# Altium PCB PCB.PcbDoc (part 2 of 5)
Units mm, origin at the board's own origin, x right, y up, seen from the top; angles counter-clockwise.
Board outline 101.6 x 53.34 mm, 6 copper layers (Top Layer, Int1 (GND), Int2, Int3, Int4 (GND), Bottom Layer), stack 1.625 mm thick; 228 components, 228 nets, 1016 pads, 995 vias.
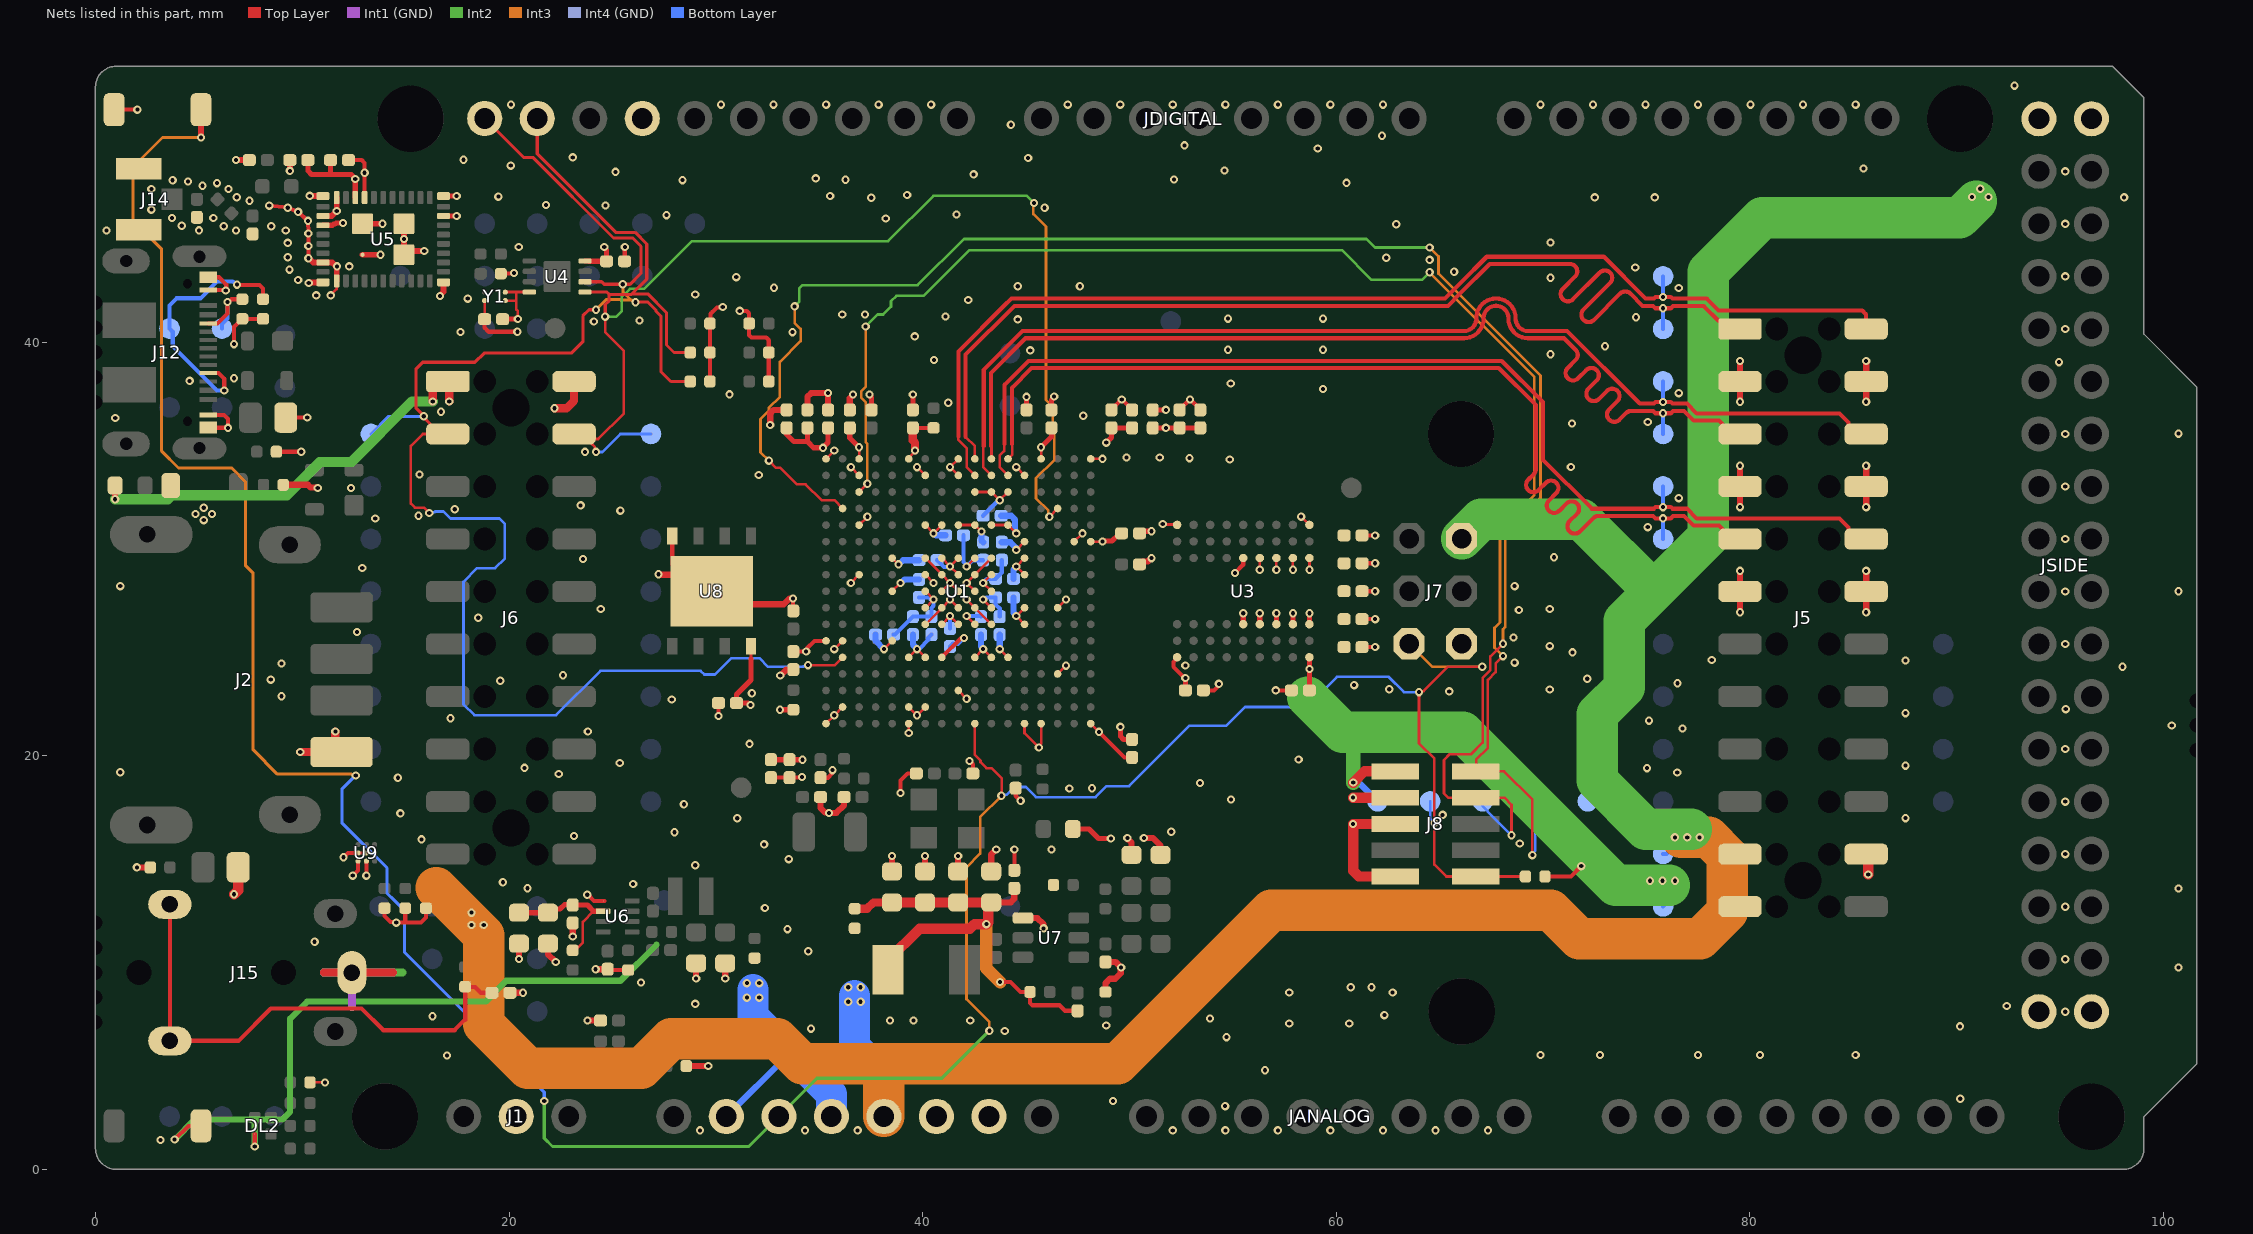
[diagram p6: the nets of this part, all layers, seen from the top]

## Part data
3V3_EN 3V3_J5 5V_EN 5V_J5 BLE_DWAKE BLE_HWAKE BLE_ON BLUE BOOT0/PC13 DFSDM1_CKOUT DFSDM1_DATIN0 DOUT0 DOUT1 DOUT2 DOUT3 DOUT4 DOUT5 DOUT6 DOUT7 DSI_CK_N DSI_CK_P DSI_D0_P DSI_D1_N DSI_D1_P DSID0N GND_J5 GREEN HREF I2S2_CK I2S2_MCK I2S2_SDO I2S2_WS IS2S_SDI JTAG_3V3 JTAG_GND JTAG_NRST JTAG_TCK_SCK JTAG_TMS/SWD LPO_IN PB12 PCLK POWER_EN PWDN PWR_LED RED SCL4 SDATA SDIO_CLK SDIO_CMD SDIO_D0 SDIO_D1 SDIO_D2 SDIO_D3 UART7_CTS UART7_RTS UART7_RX UART7_TX USB0_CC1 USB0_CC2 USB0_DN USB0_DP USB0_VBUS USB1_DN USB1_DP USB1_VBUS VSYNC WIFI_HWAKE WIFI_ON XCLK: library part UT0013-A.4, "Test point 1.00mm", Design Item ID=CMP-018-0005-A.3, Pin Count=1, Source=ut.SchLib
C1 C5 C6 C7 C8 C9 C10 C11 C16 C17 C18 C19 C20 C21 C22 C23 C24 C25 C26 C27 C28 C29 C30 C31 C37 C43 C44 C57 C59 C64 C77 C78 C79 C83: library part C0015-A.14, "CAP CHIP 0402 100nF 10% 50V X5R", Case Code (Imperial)=0402, Dielectric=X5R, Manufacturer=Murata, Tolerance=10%, Voltage=50V, Code Arduino=A5141, Part Number=GRM155R61H104KE19D, Technology=Ceramic
C2 C3: library part C0059-A.14, "CAP CHIP 0805 4.7nF 10% 1000V X7R", Case Code (Imperial)=0805, Dielectric=X7R, Manufacturer="PSA Shenzen", Manufacturer 2=KEMET, Part number 2=C0805V472KDRACTU, Part number 3=C0805C472KDRACTU, Tolerance=10%, Voltage=1kV, Code Arduino=0689, Manufacturer 3=KEMET, Part Number=FV21X472K102ECG, Technology=Ceramic
C4 C55 C56: library part C0095-A.6, Case Code (Imperial)=0402, Part Number=DNP, Code Arduino=C0095, Technology=Ceramic
C12 C36 C73 C74 C75 C76 C80 C81 C82: library part C0091-A.13, "CAP CHIP 0402 10uF 20% X5R 6.3V", Case Code (Imperial)=0402, Dielectric=X5R, Manufacturer=Murata, Tolerance=20%, Voltage=6.3V, Code Arduino=C0091, Part Number=GRM155R60J106ME05D, Technology=Ceramic
C13 C14 C15 C32 C33 C34 C35 C40 C50: library part C0031-A.14, "CAP CHIP 0402 2.2uF 10% 6.3V X5R", Case Code (Imperial)=0402, Dielectric=X5R, Manufacturer=Murata, Tolerance=10%, Voltage=6.3V, Code Arduino=A5529, Part Number=GRM155R60J225KE95D, Technology=Ceramic
C38 C39 C72: library part UT0021-A.3, "DNP CAP 0402", Package=0402, Part Number=DNP
C41 C42: library part C0037-A.14, "CAP CHIP 0402 4.7uF 20% 6V3 X5R", Case Code (Imperial)=0402, Dielectric=X5R, Manufacturer=Hottech, Manufacturer 2="Samsung Electro-Mechanics", Manufacturer 3="Murata Electronics", Part number 2=CL05A475KQ5NRNC, Part number 3=GRM155R60J475ME47D, Tolerance=20%, Voltage=6.3V, Code Arduino=0833, Part Number=C1005A475M6R3NT, Technology=Ceramic
C45 C46 C48 C49 C60 C61 C62 C63 C66 C67 C68 C69: library part C0047-A.18, "CAP CHIP 0603 10uF 20% 25V X5R", Case Code (Imperial)=0603, Dielectric=X5R, Manufacturer=Hottech, Manufacturer 2="Murata Electronics", Part number 2=CL10A106MA8NRNC, Tolerance=20%, Voltage=25V, Code Arduino=2213, Part Number=C1608A106M250NT, Technology=Ceramic
C47: library part C0029-A.14, "CAP CHIP 0402 22pF 5% 50V C0G", Case Code (Imperial)=0402, Dielectric=C0G, Manufacturer=Walsin, Manufacturer 2="Murata Electronics", Manufacturer 3=KEMET, Part number 2=GRM1555C1H220JA01D, Part number 3=C0402C220K5GAC7867, Tolerance=5%, Voltage=50V, Code Arduino=0137, Part Number=0402N220J500CT, Technology=Ceramic
C51 C53: library part C0026-A.14, "CAP CHIP 0402 18pF 5% C0G 50V", Case Code (Imperial)=0402, Dielectric=C0G, Manufacturer=KEMET, Tolerance=5%, Voltage=50V, Code Arduino=2320, Part Number=C0402C180J5GACTU, Technology=Ceramic
C52 C54: library part C0006-A.14, "CAP CHIP 0402 10pF 5% 50V C0G", Case Code (Imperial)=0402, Dielectric=C0G, Manufacturer=KEMET, Tolerance=5%, Voltage=50V, Code Arduino=3382, Part Number=C0402H100J5GACTU, Technology=Ceramic
C65: library part C0013-A.4, "CAP CHIP 0402 100pF 10% 50V C0G", Case Code (Imperial)=0402, Dielectric=C0G, Manufacturer=Yageo, Tolerance=5%, Voltage=50V, Code Arduino=C0013, Part Number=CC0402JRNPO9BN101, Technology=Ceramic
D1: library part D0026-A.6, "DIODE SCHOTTKY SMD 2A 60V SOD123FL", Forward Current=2A, Forward Voltage=0.6V, Manucturer Part Number 2=SS26L, Manufacturer=Nexperia, Code Arduino=2208, Device Type="Diode Schottky", Manucturer 2=Hottech, Part Number=PMEG6020AELRX, RoHS Compliance=RoHS3
D2 D4: library part D0025-A.5, "TVS ARRAY 4LIN.8kV 1pF SOT143B", Manufacturer=Nexperia, Code Arduino=2209, Device Type="ESD protection", Part Number=PRTR5V0U2X,215
DL1: library part L0009-A.5, "LED SMD 0603 GREEN/568 15mcd 120^", Manufacturer=Broadcom, Code Arduino=2204, Part Number=HSMG-C190, Pin Count=2
DL2: library part L0026-A.4, "LED RGB BLACK BODY SMD", Manufacturer="Cree LED", Code Arduino=L0026, Part Number=UHD1110-FKA-CL1A13R3Q1BBQFMF3, Pin Count=4
Fiducial_1 Fiducial_2 Fiducial_3 Fiducial_4 Fiducial_5: library part UT0023-A.6, "Fiducial mark 1mm clearance 2mm"
J1: library part J0237-A.2, "MOUNT A MALE HEADER TH 2.54mm VERT. 1x003POS", Code Arduino=J0237
J2: library part J0329-A.9, "CONN USB A 2.0 FEMALE RIGHT ANGLE SMD + TH TAPE AND REEL", Manufacturer="Adam Tech", Code Arduino=J0329, Part Number=USB-A-S-RA-CS11-SMT-HF-TR
J5: library part J0265-A.9, "CONN SOCKET 2ROW 24POS VERTICAL PASS THROUGH + SMD with fixing + reel + cap for pick and place", Manufacturer=4UCON, Code Arduino=J0265, Connector Type="BOARD CONNECTOR", Contact Material=Copper, Mount=Board, Number of Contacts=24, Part Number=21TW-291, REACH SVHC=Yes, Termination=SMD/SMT
J6: library part J0249-A.9, "CONN SOCKET 2ROW 20POS VERTICAL PASS THROUGH + SMD with fixing + pick and place cap, in reel", Manufacturer=4UCON, Code Arduino=J0249, Connector Type="BOARD CONNECTOR", Contact Material=Copper, Mount=Board, Number of Contacts=20, Part Number=21TW-247, REACH SVHC=Yes, Termination=SMD/SMT
J7: library part J0004-A.5, "CONN Header Through Hole 6 position 0.100\" (2.54mm)", Manufacturer="Adam Tech", Code Arduino=0114, Part Number=PH2-06-UA
J8: library part J0089-A.11, "CONN HEADER SMD 10POS 2x5 1.27MM JTAG reel, capsfor pick and place", Color=Black, Current Rating=1.75A, Manufacturer=4UCON, Package Quantity=1, Code Arduino=J0089, Connector Type="Male Pin", Contact Material=Bronze, Contact Mating Length=0.12inch, Contact Plating=Gold, Depth=3.43mm, Gender=Male, Housing Color=Black, Housing Material=Polymer, Lead Free="Lead Free", Length=6.35mm, Mount="Surface Mount", Packaging=Reel, Part Number=22TW-428, Pitch=1.27mm, Termination=Solder
J12: library part J0272-A.3, "CONN RCPT USB3.1 TYPEC 16POS SMD", Manufacturer=Hirose, Code Arduino=J0272, Part Number=CX90B-16P
J14: library part J0045-A.8, "CONN Micro UFL", Manufacturer=Hirose, Code Arduino=A5364, Part Number=U.FL-R-SMT-1(60), Pin Count=3
J15: library part J0273-A.8, "Conn Jack 4 POLES 3.5mm SMD", Manufacturer=4UCONN, Code Arduino=J0273, Part Number=22TW-258
JANALOG: library part J0313-A.5, "CONN THD 24X1 CUSTOM PITCH DUE JANALOG GREY", Manufacturer=4UCON, Code Arduino=3654, Number of Contacts=24, Number of Positions=24, Number of Rows=1, Part Number=20TW-887, Pin Count=24
JDIGITAL: library part J0262-A.10, "CONN THD 1X26 CUSTOM PITCH DUE JDIGITAL GREY", Manufacturer=4UCON, Code Arduino=3653, Number of Contacts=26, Number of Positions=26, Number of Rows=1, Part Number=20TW-890, Pin Count=26
JSIDE: library part J0315-A.4, "CONN THD 18X2 36V DUE JSIDE CUSTOM GREY", Manufacturer=4UCON, Code Arduino=3656, Number of Contacts=36, Number of Positions=36, Number of Rows=2, Part Number=20TW-891
L1: library part I0065-A.2, "IND FIXED 10UH IRMS 1.8A ISAT 2.3A 243m ohm SMD 4.45x4mm", Current=1.8A, Inductance=10µH, Manufacturer=Bourns, Code Arduino=I0065, Device Type=Inductor, Part Number=SRP4020TA-100M
L2: library part I0051-A.5, "IND FIXED SMD 0603 2.2uH, 20%,", Case Code (Imperial)=0603, DC Resistance (DCR)=250mR, Inductance=2.2µH, Manufacturer=Murata, Max Operating Temperature=85°C, Min Operating Temperature=-40°C, Test Frequency=1MHz, Tolerance=20%, Code Arduino=I0051, Device Type=Inductor, Part Number=LQM18PN2R2MGHD
L3: library part I0045-A.10, "IND CHIP 0806 3.3 uH 20% 1.2A", Case Code (Imperial)=0806, Case Code (Metric)=2016, Current Rating=1.2A, DC Resistance (DCR)=255mR, Inductance=3.3µH, Manufacturer="Taiyo Yuden", Manufacturer 2=Murata, Manufacturer Part Number 2=LQM2MPN3R3NG0L, Max DC Current=1.15A, Max Operating Temperature=105°C, Min Operating Temperature=-40°C, Package Quantity=3000, Resistor Type=Wirewound, Test Frequency=2MHz, Tolerance=20%, Case/Package=0806, Code Arduino=I0045, Core Material=Metal, Device Type=Inductor, Halogen Free="Halogen Free", Height=1mm, Height - Seated (Max)=0.039inch, Length=0.079inch, Mount="Surface Mount", Packaging="Tape and Reel", Part Number=MAKK2016T3R3M, Saturation Current=1.15A, Shielding=Shielded, Termination=SMD/SMT, Width=1.6mm
L4: library part I0063-A.3, "IND 47uH 20% Isat 20mA f 10MHz 0603", Case Code (Imperial)=0603, Current=20mA, DC Resistance (DCR)=2.55, Frequency=10MHz, Inductance=47µH, Manufacturer=Murata, Max DC Current=180mA, Tolerance=20%, Code Arduino=I0063, Part Number=LQM18DH470M70L, Series Resistance=2.55
PB1 PB2: library part B0001-A.7, "PUSHBUTTON WHITE NO ANCHORS", Color=White, Manufacturer=Switronic, Code Arduino=0173, Mount=SMT, Part Number=IT-1185AP1C-160G-GTR
R1 R18: library part R0070-A.24, "RES CHIP 0402 976k 1% 1/16W", Case Code (Imperial)=0402, Manufacturer=Vishay, Power=62.5mW, Temperature Coefficient=100ppm, Tolerance=1%, Code Arduino=R0070, Part Number=CRCW0402976KFKED, Technology="Thick film"
R2 R17 R32 R34 R37: library part R0210-A.18, "RES CHIP 0402 5K1 1% 1/16W", Case Code (Imperial)=0402, Manufacturer=YAGEO, Power=63mW, Temperature Coefficient=100ppm, Tolerance=1%, Code Arduino=R0210, Part Number=RC0402FR-075K1L, Technology="Thick film"
R3 R4 R21 R30 R31: library part R0001-A.23, "RES CHIP 0402 100K 1% 1/16W", Case Code (Imperial)=0402, Manufacturer=Vishay, Power=62.5mW, Temperature Coefficient=100ppm, Tolerance=1%, Code Arduino=0134, Part Number=CRCW0402100KFKEDC, Technology="Thick film"
R5 R6 R8 R9 R14 R22 R23 R24 R25 R38 R39 R40: library part R0000-A.23, "RES CHIP 0402 0R 1/16W", Case Code (Imperial)=0402, Manufacturer=Vishay, Power=62.5mW, Temperature Coefficient=0ppm, Tolerance=0%, Code Arduino=0039, Part Number=CRCW04020000Z0EDC, Technology="Thick film"
R7 R10 R11 R12 R13: library part R0017-A.23, "RES CHIP 0402 330R 5% 1/16W", Case Code (Imperial)=0402, Manufacturer=Vishay, Power=62.5mW, Temperature Coefficient=200ppm, Tolerance=5%, Code Arduino=2229, Part Number=CRCW0402330RJNED, Technology="Thick film"
R15: library part R0070-A.24, "RES CHIP 0402 976K 1% 1/16W", Case Code (Imperial)=0402, Manufacturer=Vishay, Power=62.5mW, Temperature Coefficient=100ppm, Tolerance=1%, Code Arduino=R0070, Part Number=CRCW0402976KFKED, Technology="Thick film"
R16: library part R0028-A.23, "RES CHIP 0402 220K 1% 1/16W", Case Code (Imperial)=0402, Manufacturer=Vishay, Power=62.5mW, Temperature Coefficient=200ppm, Tolerance=1%, Code Arduino=2334, Part Number=CRCW0402220KFKED, Technology="Thick film"
R19 R20 R26 R27 R28 R29 R36: library part R0210-A.18, "RES CHIP 0402 5k1 1% 1/16W", Case Code (Imperial)=0402, Manufacturer=YAGEO, Power=63mW, Temperature Coefficient=100ppm, Tolerance=1%, Code Arduino=R0210, Part Number=RC0402FR-075K1L, Technology="Thick film"
R33 R35: library part R0033-A.23, "RES CHIP 0402 19k1 1% 1/16W", Case Code (Imperial)=0402, Manufacturer=Vishay, Power=62.5mW, Temperature Coefficient=100ppm, Tolerance=1%, Code Arduino=A5369, Part Number=CRCW040219K1FKEDC, Technology="Thick film"
U1: library part U0020-A.8, "IC MCU Cortex M7 + Cortex M4", Manufacturer="ST Microelectronics", Code Arduino=A5524, Part Number=STM32H747XIH6
U3: library part U0122-A.4, "IC SDRAM 64 Mb PC133 SDR", Manufacturer="Alliance Memory", Code Arduino=U0122, Part Number=AS4C4M16SA-6BIN
U4: library part U0034-A.8, "IC AUTHENTICATION CHIP UDFN8", Manufacturer=Microchip, Code Arduino=U0034, Part Number=ATECC608A-MAHDA-T
U5: library part U0008-A.17, "MODULE WiFi 11b/g/n+BLUETOOTH 4.2 SHIELDED ULTRA SMALL LBEE5KL1DX", Manufacturer=Murata, Code Arduino=U0008, Part Number=LBEE5KL1DX-883
U6: library part U0072-A.8, "IC STEP DOWN CONV 1A 22V QFN8", Manufacturer="Monolithic Power Systems", Code Arduino=U0072, Part Number=MP2322GQH
U7: library part U0241-A.6, "IC BUCK VIN 3V8 to 32V Iout 4A duty 100% fsw 500kHz TSOT26", Manufacturer="Diodes Incorporated", Code Arduino=U0241, Part Number=AP63200WU-7
U8: library part U0197-A.9, "IC FLASH 128MB 6DFN 3V", Manufacturer="Adesto Technologies", Code Arduino=U0197, Part Number=AT25SF128A-MHB-T
U9: library part U0272-A.3, "IC Power switch 2.5V to 5.5V 1A reverse blocking, adj current limit, WLCSP9", Manufacturer=Renesas, Code Arduino=U0272, Part Number=SLG59H1341C
Y1: library part X0002-A.6, "MEMS OSC XO 32.7680KHZ LVCMOS", Current Rating=1.35uA, Frequency=32.768kHz, Frequency Stability=100ppm, Load Capacitance=10pF, Manufacturer=SiTIME, Max Operating Temperature=85°C, Max Supply Current=1.4uA, Max Supply Voltage=3.63V, Min Operating Temperature=-40°C, Min Supply Voltage=1.5V, Code Arduino=X0002, Max Duty Cycle=52%, Part Number=SIT1532AI-J4-DCC-32.768E
Y2: library part X0003-A.5, "CRYSTAL 32.768kHz 20ppm 12.5pF SMD 1.6x0.9mm", Frequency=32.768kHz, Frequency Stability=0.12%, Frequency Tolerance=20ppm, Load Capacitance=12.5pF, Manufacturer="Citizen FineDevice", Max Operating Temperature=85°C, Min Operating Temperature=-40°C, Series Resistance=70kR, Code Arduino=0213, Part Number=CM315D32768DZFT, Radiation Hardening=No
Y3: library part X0019-A.12, "CRYSTAL 16.0000MHz 12pF SMD", Frequency=16MHz, Manufacturer="Fronter Electronics", Code Arduino=0395, Part Number=FTX16.000M12SM3S-30/30

## Free pads (board coordinates)
  round 3.2 hole 3.2 unplated: MH(13.996,2.553) MH(15.24,50.8) MH(66.04,35.56) MH(66.066,7.633) MH(90.17,50.8) MH(96.52,2.54)
  round 0.5 hole 0.7 unplated: MOUSEBITE(0,7.113) MOUSEBITE(0,8.313) MOUSEBITE(0,9.513) MOUSEBITE(0,10.713) MOUSEBITE(0,11.913) MOUSEBITE(0,37.1) MOUSEBITE(0,38.3) MOUSEBITE(0,39.5) MOUSEBITE(0,40.7) MOUSEBITE(0,41.9) MOUSEBITE(101.6,20.263) MOUSEBITE(101.6,21.463) MOUSEBITE(101.6,22.663)

## Via types
v1: diameter 0.4, hole 0.2, Top Layer to Bottom Layer, tented both sides, 995 vias

## Nets (pads, with @x,y where several pads share a name; then routed paths per layer and width w, separated by ;. In a path a pad name is that pad's centre, name@x,y a point inside that pad or via, vN(x,y) a via of type N, cw(c..) or ccw(c..) an arc to the next point about the centre after c; other vN are vias at no path point)
5V_BUCK_OUT_4: C62.2 C63.2 C64.1 C65.2 C66.2 C67.2 L1.2 R31.1 R38.1 | length 22.8
  Top Layer w0.2: v1(43.743,9.052) 44.248,9.052 44.725,8.575 R31.1@45.192,8.575 45.192,8.048 45.309,7.931 46.611,7.931 46.877,7.665 C65.2@47.492,7.665
  Top Layer w0.3: C62.2@43.316,12.903 44.257,12.903 44.433,13.078 C64.1@44.433,13.587
  Top Layer w0.4: R38.1@36.717,12.601 37.318,12.601 37.62,12.903 C67.2@38.516,12.903
  Top Layer w0.5: L1.2@38.316,10.103 39.849,11.636 42.284,11.636 42.504,11.856 v1(43.081,11.856) ; C67.2@38.516,12.903 C66.2@40.116,12.903 C63.2@41.716,12.903 C62.2@43.316,12.903 43.166,12.753 43.166,11.951 v1@43.081,11.866
  Int3 w0.6: v1(43.081,11.856) 43.081,9.714 v1(43.743,9.052)
+3V3: 3V3_J5.X C1.2 C5.2 C6.2 C7.2 C8.2 C9.2 C10.2 C11.2 C12.2 C13.2 C14.2 C15.2 C16.2 C17.2 C18.2 C19.2 C21.2 C22.2 C23.2 C24.2 C25.2 C26.2 C27.2 C28.2 C29.2 C30.2 C31.2 C37.2 C40.2 C41.1 C57.2 C73.2 C74.2 C75.2 C76.2 C77.2 C78.2 C79.2 C80.2 C81.2 C82.2 C83.2 DL1.A DL2.4 J5.23 J6.1 J8.1 JANALOG.2 JANALOG.4 JTAG_3V3.X L4.1 PB2.2 R3.1 R5.1 R19.2 R20.2 R21.1 R26.2 R27.2 R28.2 R29.2 R39.2 U1.A6 U1.C17 U1.E6 U1.E9 U1.E11 U1.F5 U1.F17 U1.G5 U1.G13 U1.H5 U1.H13 U1.J13 U1.K5 U1.K13 U1.L5 U1.L13 U1.M5 U1.M13 U1.N7 U1.N8 U1.N10 U1.N11 U1.N12 U1.P17 U1.U12 U3.A7 U3.A9 U3.B3 U3.C7 U3.D3 U3.E7 U3.J9 U4.8 U5.30 U5.36 U8.8 Y1.3 | length 173.9
  Top Layer w0.127: C57.2@18.819,41.11 Y1.3@18.819,42.005 ; U1.C17@36.926,34.353 v1(36.926,34.919) ; v1(38.126,25.153) U1.E6@38.526,25.553 ; U1.E9@38.526,27.953 v1(38.926,28.353) ; U1.E11@38.526,29.553 v1(38.826,29.253) ; U1.F5@39.326,24.753 v1(39.726,25.153) U1.G5@40.126,24.753 ; U1.F17@39.326,34.353 39.326,34.401 39.633,34.708 v1(39.633,34.756) ; U1.G13@40.126,31.153 v1(40.526,30.753) U1.H13@40.926,31.153 ; U1.J13@41.726,31.153 42.531,31.153 42.839,30.845 v1(42.844,30.845) ; U1.K5@42.526,24.753 v1(42.926,25.153) U1.L5@43.326,24.753 ; U1.L13@43.326,31.153 U1.M13@44.126,31.153 v1(44.526,30.753) ; v1(43.726,25.153) U1.M5@44.126,24.753 ; v1(44.526,29.953) U1.N12@44.926,30.353 ; U1.N7@44.926,26.353 v1(44.526,26.753) U1.N8@44.926,27.153 ; U1.N10@44.926,28.753 v1(44.526,29.153) U1.N11@44.926,29.553 ; U1.P17@45.726,34.353 v1(45.726,34.919) ; U1.U12@48.126,30.353 v1(48.692,30.353) ; v1(56.304,28.994) U3.D3@56.304,29.56 ; v1(57.904,28.994) U3.B3@57.904,29.56
  Top Layer w0.15: 31.701,24.701 U8.8@31.701,25.283
  Top Layer w0.2: v1(3.827,1.438) 4.49,2.1 PB2.2@5.1,2.1 ; v1(7.7,1.1) 7.705,1.105 DL2.4@7.705,1.705 ; C57.2@18.819,41.11 18.819,40.696 19.015,40.5 v1(20.4,40.5) ; R26.2@29.71,38.098 R27.2@29.71,39.498 R19.2@29.71,40.898 29.735,40.923 29.735,41.371 29.852,41.488 29.859,41.488 30.049,41.678 30.309,41.678 v1(30.332,41.701) ; v1(31.153,41.512) 31.493,41.512 31.61,41.395 R20.2@31.61,40.898 31.6,40.888 31.6,40.332 31.717,40.215 32.436,40.215 32.56,40.091 R29.2@32.56,38.098 ; C18.2@33.748,25.034 v1@34.364,25.034 ; v1(34.365,25.035) 34.403,25.073 34.403,25.194 34.762,25.553 U1.A6@35.326,25.553 ; C28.2@39.526,35.853 R5.1@40.526,35.853 ; U1.H5@40.926,24.765 40.938,24.765 41.829,25.656 41.934,25.656 v1@41.972,25.694 ; U3.J9@52.304,24.76 52.304,24.716 52.125,24.538 52.125,24.299 v1@52.665,23.76 ; R21.1@70.096,14.16 71.346,14.16 v1(71.846,14.66)
  Top Layer w0.25: C40.2@10.27,48.804 10.27,48.285 10.444,48.111 11.37,48.111 ; U5.36@11,45.65 11.461,45.65 11.519,45.708 11.588,45.708 11.639,45.758 v1(11.964,45.758) ; C41.1@11.37,48.804 11.37,48.111 ; v1@12.563,47.892 12.563,47.918 12.37,48.111 11.37,48.111 ; U5.30@12.565,46.99 v1(12.565,47.89) ; U4.8@23.671,43.92 23.861,43.92 23.872,43.909 C37.2@24.717,43.909 24.717,44.443 24.6,44.559 v1(24.6,44.6) ; v1(31.672,22.456) 31.631,22.456 31.539,22.548 31.001,22.548 31.001,22.956 31.701,23.656 31.701,24.701 ; C83.2@32.665,19.805 C82.2@33.565,19.805 v1(34.194,19.805) v1@34.2,19.805 ; v1(33.096,22.223) R3.1@33.746,22.223 ; C77.2@33.426,35.853 33.426,35.533 33.771,35.188 34.426,35.188 ; C74.2@34.426,35.853 34.426,35.188 ; C73.2@35.426,35.853 35.426,35.138 v1(35.176,34.888) 34.726,34.888 34.426,35.188 ; C29.2@36.476,35.962 C29.2@36.476,35.853 36.476,35.369 v1(36.926,34.919) ; v1(45.726,34.919) 46.226,35.419 C27.2@46.226,35.853 ; L4.1@47.328,16.454 48.046,16.454 48.5,16 v1(49.1,16) ; v1(48.692,30.353) 48.721,30.382 49.15,30.382 49.431,30.663 49.431,30.674 49.61,30.853 C19.2@49.621,30.853 ; v1(48.876,35.138) 49.126,35.388 C75.2@49.126,35.853 C76.2@50.126,35.853 ; v1(49.561,21.394) 49.561,20.938 49.711,20.788 C79.2@50.126,20.788 ; C78.2@51.126,35.853 v1(51.761,35.853) C80.2@52.426,35.853 C81.2@53.426,35.853 ; v1@52.665,23.76 v1(52.704,23.76) C11.2@52.704,23.16 ; U3.E7@55.503,26.36 v1(55.503,26.887) ; U3.C7@57.104,26.36 v1(57.103,26.887) ; C9.2@58.704,23.16 v1(58.704,24.193) U3.A9@58.704,24.76 ; U3.A7@58.703,26.36 v1(58.703,26.887)
  Top Layer w0.3: v1(0.95,32.401) DL1.A@0.95,33.062
  Top Layer w0.4: v1(16.31,37.13) 16.31,37.789 16.62,38.099 J6.1@17.342,38.099 ; v1(17.11,37.13) 17.11,37.789 J6.1@17.42,38.099 ; C28.2@39.526,35.853 39.526,35.245 39.633,35.138 v1(39.633,34.756)
  Top Layer w0.5: v1(60.825,18.699) 61.367,19.24 J8.1@62.846,19.24
  Int2 w0.3: v1(3.827,1.438) 4.802,2.413 7.7,2.413 ; v1(7.7,1.1) 7.7,2.413 ; 27.135,10.86 25.388,9.113 19.863,9.113 18.863,8.113 10.233,8.113 9.409,7.289 9.409,2.775 9.047,2.413 7.7,2.413
  Int2 w0.5: v1(0.95,32.401) 3.501,32.401 3.7,32.6 9.25,32.6 10.85,34.2 12.375,34.2 15.305,37.13 v1(16.31,37.13)
  Int2 w0.7: v1(60.825,18.699) 60.825,21.13
  Int2 w2: 58.615,22.826 60.31,21.13 60.825,21.13 66.118,21.13 73.51,13.738 76.098,13.738
  Bottom Layer w0.2: v1(39.726,25.153) 39.764,25.191 39.867,25.191 40.268,25.592 40.268,25.694 C22.2@40.426,25.853 ; C15.2@41.326,25.283 41.455,25.412 41.716,25.412 v1(41.999,25.694) ; 3V3_J5.X@75.805,12.713 76.375,13.283 v1(76.375,13.95)
  Bottom Layer w0.3: JANALOG.2@30.506,2.553 33.476,5.523 33.693,5.523 ; C16.2@37.726,25.853 37.726,25.553 v1(38.126,25.153) ; v1(38.826,29.253) 38.85,29.253 39.05,29.453 C31.2@39.826,29.453 ; v1(38.926,28.353) 38.953,28.353 39.123,28.523 C12.2@39.826,28.523 ; C17.2@39.526,25.853 39.526,25.377 39.726,25.177 v1(39.726,25.153) ; v1(40.526,30.753) 40.553,30.753 40.647,30.66 C13.2@41.104,30.66 ; C23.2@42.826,25.853 42.826,25.28 42.926,25.18 v1(42.926,25.153) ; v1(42.844,30.845) 42.844,30.405 C30.2@42.926,30.323 ; v1(43.726,25.153) C21.2@43.726,25.853 ; C26.2@43.796,31.603 44.283,31.603 44.466,31.42 44.466,30.84 44.526,30.78 v1(44.526,30.753) ; C14.2@43.826,30.323 44.241,30.323 44.507,30.057 44.507,29.972 v1(44.526,29.953) ; C24.2@44.396,27.653 44.396,26.91 44.526,26.78 v1(44.526,26.753) ; C25.2@44.396,28.553 44.396,28.996 44.526,29.126 v1(44.526,29.153) ; v1(60.825,18.699) 60.844,18.68 61.115,18.68 JTAG_3V3.X@62.002,17.793
  Bottom Layer w1.5: 31.8,8.7 31.8,7.416 33.693,5.523 35.586,3.63 JANALOG.4@35.586,2.553
  other v1: 31.5,8.3 32.1,8.3 31.5,9 32.1,9 75.175,13.95 75.775,13.95
+5V: 5V_J5.X C44.1 C45.2 C46.2 D1.C J5.21 J7.2 JANALOG.5 JSIDE.1 JSIDE.2 R30.1 R38.2 U6.2 U9.A1 U9.B1 | length 155.1
  Top Layer w0.127: R30.1@23.178,10.586 23.571,10.978 23.571,11.967 24.085,12.48
  Top Layer w0.2: v1(12.444,14.2) 12.7,14.456 U9.A1@12.7,14.9 ; v1(13.1,14.2) U9.B1@13.1,14.9
  Top Layer w0.25: C46.2@20.578,12.409 C45.2@21.878,12.409 22.051,12.581 22.463,12.581 22.688,12.806 C44.1@23.01,12.806 ; C44.1@23.078,12.779 23.787,12.779 24.085,12.48 24.333,12.48 24.335,12.479 U6.2@24.62,12.479
  Int2 w2: J7.2@66.066,30.493 67.014,31.441 71.853,31.441 75.346,27.948 ; 77.174,16.452 74.974,16.452 72.625,18.801 72.625,21.999 73.925,23.299 73.925,26.528 75.346,27.948 ; 90.942,46.813 90.142,46.013 80.593,46.013 77.988,43.408 77.988,30.59 75.346,27.948
  Int3 w2: 16.474,13.613 18.778,11.309 18.778,7.012 20.899,4.891 26.403,4.891 27.829,6.317 32.963,6.317 34.175,5.105 38.126,5.105 ; JANALOG.5@38.126,2.553 38.126,5.105 ; 76.674,16.052 v1(76.974,16.052) v1(77.574,16.052) 78.01,16.052 78.914,15.148 78.914,12.461 77.599,11.146 71.752,11.146 70.374,12.524 56.85,12.524 49.43,5.105 38.126,5.105
  Bottom Layer w0.2: 5V_J5.X@75.805,15.253 75.978,15.253 76.374,15.649 v1(76.374,16.052)
  Bottom Layer w1.5: 36.7,8.4 36.7,5.952 38.126,4.526 JANALOG.5@38.126,2.553
  other v1: 36.4,8.1 37,8.1 36.4,8.8 37,8.8 18.178,11.809 18.778,11.809 18.178,12.409 5.237,31.391 4.837,31.691 5.637,31.691 5.237,31.991 90.742,47.013 91.542,47.013 91.142,47.413
CC1_USB0_3: J12.A5 R2.1 USB0_CC1.X | length 3.9
  Top Layer w0.2: J12.A5@5.454,40.9 5.9,40.9 6.389,41.388 v1(6.389,41.944) 6.443,41.944 6.574,42.075 R2.1@7.1,42.075
  Bottom Layer w0.2: USB0_CC1.X@6.122,40.653 6.122,40.869 6.389,41.136 v1(6.389,41.944)
CC2_USB0_3: J12.B5 R17.1 USB0_CC2.X | length 12.5
  Top Layer w0.2: J12.B5@5.454,38.5 5.955,38.5 6.229,38.226 v1(6.229,37.665) ; v1@6.854,42.768 7.932,42.768 8.1,42.6 R17.1@8.1,42.075
  Bottom Layer w0.2: v1(6.229,37.665) 5.872,37.665 3.735,39.802 3.735,40.5 USB0_CC2.X@3.582,40.653 3.582,41.775 3.924,42.118 5.075,42.118 5.884,42.927 6.641,42.927 6.788,42.78 v1(6.843,42.78)
DSI_CK_N: DSI_CK_N.X J5.5 U1.L17 | length 51.7
  Top Layer w0.127: 43.301,34.978 43.326,34.953 U1.L17@43.326,34.353
  Top Layer w0.2: 43.301,34.978 43.301,38.514 44.975,40.188 65.9,40.188 66.175,40.188 ccw(c66.175,41.138) 67.125,41.138 67.125,41.159 cw(c67.725,41.159) 67.725,41.759 cw(c67.725,41.159) 68.325,41.159 68.325,41.138 ccw(c69.275,41.138) 69.275,40.188 70.896,40.188 70.989,40.188 71.017,40.188 71.074,40.132 71.574,39.631 cw(c71.324,39.381) 71.574,39.13 71.196,38.752 ccw(c71.446,38.501) 71.196,38.251 ccw(c71.446,38.501) 71.696,38.251 72.091,38.646 cw(c72.341,38.396) 72.592,38.646 cw(c72.341,38.396) 72.592,38.145 72.197,37.75 ccw(c72.447,37.5) 72.197,37.25 ccw(c72.447,37.5) 72.697,37.25 73.092,37.645 cw(c73.343,37.394) 73.593,37.645 cw(c73.343,37.394) 73.593,37.144 73.198,36.749 ccw(c73.448,36.499) 73.198,36.248 ccw(c73.448,36.499) 73.699,36.248 74.02,36.57 cw(c74.27,36.319) 74.27,36.673 74.532,36.673 75.073,36.673 75.32,36.673 75.363,36.63 75.434,36.559 ; 75.434,36.559 v1(75.805,36.559) 76.176,36.559 76.291,36.673 76.816,36.673 77.285,36.204 78.501,36.204 78.671,36.035 78.671,35.957 79.069,35.559 J5.5@79.525,35.559
  Bottom Layer w0.2: DSI_CK_N.X@75.805,35.559 v1(75.805,36.559)
DSI_CK_P: DSI_CK_P.X J5.6 U1.L16 | length 53.5
  Top Layer w0.127: 42.951,34.978 42.926,34.953 42.926,33.953 U1.L16@43.326,33.553
  Top Layer w0.2: 42.951,34.978 42.951,38.514 42.951,38.659 44.83,40.538 65.9,40.538 66.175,40.538 ccw(c66.175,41.138) 66.775,41.138 66.775,41.159 cw(c67.725,41.159) 67.725,42.109 cw(c67.725,41.159) 68.675,41.159 68.675,41.138 ccw(c69.275,41.138) 69.275,40.538 70.896,40.538 71.162,40.538 74.677,37.023 75.359,37.023 75.434,37.099 v1(75.805,37.099) 76.176,37.099 76.251,37.023 76.961,37.023 77.43,36.554 84.33,36.554 84.771,36.113 84.771,35.957 85.169,35.559 J5.6@85.325,35.559
  Bottom Layer w0.2: v1(75.805,37.099) DSI_CK_P.X@75.805,38.099
DSI_D0_N: DSID0N.X J5.9 U1.M17 | length 51.3
  Top Layer w0.127: U1.M17@44.126,34.353 44.337,34.564 44.337,34.818 44.337,35.053 44.312,35.078
  Top Layer w0.2: 44.312,35.078 44.312,37.79 45.264,38.741 67.859,38.741 69.65,36.95 69.65,35.855 69.65,33.858 cw(c69.296,33.858) 69.546,33.608 69.283,33.345 ccw(c69.534,33.094) 69.283,32.844 ccw(c69.534,33.094) 69.784,32.844 70.139,33.199 cw(c70.389,32.949) 70.64,33.199 cw(c70.389,32.949) 70.64,32.699 70.285,32.344 ccw(c70.535,32.093) 70.285,31.843 ccw(c70.535,32.093) 70.785,31.843 71.14,32.198 cw(c71.391,31.948) 71.641,32.198 cw(c71.391,31.948) 71.641,31.697 71.286,31.342 ccw(c71.536,31.092) 71.286,30.842 ccw(c71.536,31.092) 71.786,30.842 72.434,31.49 cw(c72.685,31.239) 72.685,31.593 74.742,31.593 75.32,31.593 75.434,31.479 v1(75.805,31.479) 76.176,31.479 76.291,31.593 76.816,31.593 77.285,31.124 78.501,31.124 78.671,30.955 78.671,30.877 J5.9@79.069,30.479 ; J5.9@79.042,30.479 J5.9@79.069,30.479 ; J5.9@79.825,30.479 J5.9@79.525,30.479 J5.9@79.069,30.479
  Bottom Layer w0.2: DSID0N.X@75.805,30.479 v1(75.805,31.479)
DSI_D0_P: DSI_D0_P.X J5.10 U1.M16 | length 52.8
  Top Layer w0.127: 43.962,35.078 43.937,35.053 43.937,34.984 43.937,34.73 43.726,34.519 43.726,33.953 U1.M16@44.126,33.553
  Top Layer w0.2: 43.962,35.078 43.962,37.935 45.119,39.091 68.004,39.091 70,37.095 70,34.301 72.358,31.943 75.359,31.943 75.434,32.019 v1(75.805,32.019) 76.176,32.019 76.251,31.943 76.961,31.943 77.43,31.474 84.33,31.474 84.771,31.033 84.771,30.877 85.169,30.479 J5.10@85.325,30.479
  Bottom Layer w0.2: v1(75.805,32.019) DSI_D0_P.X@75.805,33.019
DSI_D1_N: DSI_D1_N.X J5.1 U1.K17 | length 54.4
  Top Layer w0.127: 42.08,35.422 42.526,34.976 U1.K17@42.526,34.353
  Top Layer w0.2: 42.08,35.423 42.08,39.401 44.432,41.753 65.397,41.753 65.987,42.343 67.423,43.779 70.7,43.779 70.764,43.779 71.302,43.779 cw(c71.302,43.425) 71.552,43.174 70.953,42.575 ccw(c71.204,42.325) 70.953,42.074 ccw(c71.204,42.325) 71.454,42.074 72.741,43.362 cw(c72.992,43.111) 73.242,43.362 cw(c72.992,43.111) 73.242,42.861 71.955,41.574 ccw(c72.205,41.324) 71.955,41.073 ccw(c72.205,41.324) 72.455,41.073 73.726,42.344 cw(c73.977,42.094) 74.227,42.344 74.818,41.753 75.32,41.753 75.434,41.639 75.747,41.639 v1(75.805,41.639) 76.176,41.639 76.291,41.753 77.768,41.753 78.496,41.026 79.138,41.026 J5.1@79.525,40.639
  Bottom Layer w0.2: DSI_D1_N.X@75.805,40.639 v1(75.805,41.639)
DSI_D1_P: DSI_D1_P.X J5.2 U1.K16 | length 55
  Top Layer w0.127: 41.73,35.442 41.73,35.269 42.126,34.873 42.126,33.953 U1.K16@42.526,33.553
  Top Layer w0.2: 41.73,35.442 41.73,39.546 43.941,41.757 44.288,42.103 65.252,42.103 65.987,42.838 67.278,44.129 70.7,44.129 72.937,44.129 74.963,42.103 75.359,42.103 75.434,42.179 v1(75.805,42.179) 76.176,42.179 76.251,42.103 77.913,42.103 78.483,41.534 85.436,41.534 85.625,41.344 J5.2@85.625,40.639
  Bottom Layer w0.2: v1(75.805,42.179) DSI_D1_P.X@75.805,43.179
GND: C1.1 C2.1 C3.1 C5.1 C6.1 C7.1 C8.1 C9.1 C10.1 C11.1 C12.1 C13.1 C14.1 C15.1 C16.1 C17.1 C18.1 C19.1 C21.1 C22.1 C23.1 C24.1 C25.1 C26.1 C27.1 C28.1 C29.1 C30.1 C31.1 C32.1 C33.1 C34.1 C35.1 C36.1 C37.1 C38.2 C39.2 C40.1 C41.2 C42.2 C44.2 C45.1 C46.1 C48.1 C49.1 C50.1 C51.2 C52.2 C53.2 C54.2 C55.1 C56.1 C57.1 C59.2 C61.1 C62.1 C63.1 C64.2 C66.1 C67.1 C69.1 C72.2 C73.1 C74.1 C75.1 C76.1 C77.1 C78.1 C79.1 C80.1 C81.1 C82.1 C83.1 GND_J5.X J1.2 J2.4 J5.3 J5.4 J5.7 J5.8 J5.11 J5.12 J5.22 J6.2 J7.6 J8.3 J8.5 J8.9 J12.A1 J12.A12 J12.B1 J12.B12 J14.GND J15.1 JANALOG.6 JANALOG.7 JDIGITAL.4 JSIDE.35 JSIDE.36 JTAG_GND.X PB1.1 R1.1 R2.2 R4.2 R10.1 R16.1 R17.2 R18.1 R23.1 R32.1 R33.1 R34.1 R36.2 R37.1 R40.1 U1.A1 U1.A17 U1.B2 U1.B6 U1.C10 U1.C13 U1.C16 U1.F1 U1.F2 U1.G2 U1.G7 U1.G8 U1.G9 U1.G10 U1.G11 U1.G16 U1.H7 U1.H8 U1.H9 U1.H10 U1.H11 U1.J3 U1.J7 U1.J8 U1.J9 U1.J10 U1.J11 U1.J16 U1.J17 U1.K7 U1.K8 U1.K9 U1.K10 U1.K11 U1.K15 U1.L7 U1.L8 U1.L9 U1.L10 U1.L11 U1.L15 U1.M15 U1.N1 U1.N16 U1.P1 U1.R4 U1.R8 U1.T12 U1.U1 U1.U17 U3.A1 U3.A3 U3.B7 U3.C3 U3.D7 U3.E3 U3.J1 U4.4 U5.1 U5.12 U5.19 U5.21 U5.29 U5.32 U5.33 U5.35 U5.40 U5.42 U5.43 U5.44 U5.45 U5.46 U6.1 U7.4 U8.4 U8.9 U9.A2 U9.B2 Y1.1 Y1.4 | length 204
  Top Layer w0.127: R4.2@10.375,4.2 v1(11.1,4.2) ; v1(11.375,42.262) 11.375,42.27 11.665,42.561 U5.1@11.665,42.96 ; Y1.4@19.819,42.005 20.347,42.005 20.347,42.365 20.403,42.42 ; Y1.1@19.819,42.415 19.824,42.42 20.403,42.42 ; 20.349,42.003 20.349,41.575 20.426,41.498 20.426,41.123 v1(20.426,41.121) ; U4.4@20.981,42.42 20.403,42.42 ; U1.A1@35.326,21.553 v1(35.726,21.953) U1.B2@36.126,22.353 ; U1.A17@35.326,34.353 v1(35.726,34.753) ; v1(35.726,25.153) U1.B6@36.126,25.553 ; v1(36.526,28.353) U1.C10@36.926,28.753 ; v1(36.526,33.953) U1.C16@36.926,33.553 ; U1.C13@36.926,31.153 v1(37.326,31.553) ; v1(39.326,21.103) U1.F1@39.326,21.553 ; U1.F2@39.326,22.353 v1(39.726,21.953) U1.G2@40.126,22.353 ; v1(39.726,33.953) U1.G16@40.126,33.553 ; U1.G7@40.126,26.353 U1.H8@40.926,27.153 v1(41.326,27.553) U1.J8@41.726,27.153 ; U1.G8@40.126,27.153 v1(40.526,27.553) U1.G9@40.126,27.953 ; U1.G10@40.126,28.753 v1(40.526,28.353) ; U1.G11@40.126,29.553 U1.H10@40.926,28.753 v1(41.326,28.353) ; U1.H7@40.926,26.353 v1(41.326,26.753) U1.J7@41.726,26.353 ; U1.H9@40.926,27.953 v1(41.326,28.353) ; U1.H11@40.926,29.553 v1(41.326,29.153) ; U1.J3@41.726,23.153 v1(42.126,22.753) ; U1.J9@41.726,27.953 v1(41.326,28.353) ; U1.J10@41.726,28.753 v1(41.326,29.153) ; U1.J11@41.726,29.553 v1(41.326,29.153) ; U1.J16@41.726,33.553 v1(41.326,33.953) U1.J17@41.726,34.353 ; v1(42.126,26.753) U1.K7@42.526,26.353 ; v1(42.126,27.553) U1.K8@42.526,27.153 U1.L7@43.326,26.353 ; v1(42.126,29.153) U1.K11@42.526,29.553 ; U1.K9@42.526,27.953 v1(42.126,28.353) U1.K10@42.526,28.753 U1.L11@43.326,29.553 ; U1.K15@42.526,32.753 U1.L15@43.326,32.753 v1(43.726,32.353) U1.M15@44.126,32.753 ; v1(42.926,27.553) U1.L8@43.326,27.153 ; U1.L9@43.326,27.953 v1(42.926,28.353) U1.L10@43.326,28.753 ; v1(44.526,33.953) U1.N16@44.926,33.553 ; U1.N1@44.926,21.553 44.926,21.094 v1(45.619,20.401) 45.619,20.475 45.726,20.583 U1.P1@45.726,21.553 ; U1.R4@46.526,23.953 v1(46.926,24.353) ; U1.R8@46.526,27.153 v1(46.926,27.553) ; U1.T12@47.326,30.353 v1(47.726,30.753) ; U1.U1@48.126,21.553 v1(48.526,21.153) ; U1.U17@48.126,34.353 v1(48.692,34.353) ; v1(51.611,31.204) 51.633,31.182 52.282,31.182 U3.J1@52.304,31.16 ; v1(57.104,28.994) U3.C3@57.104,29.56 ; v1(58.304,31.56) U3.A1@58.704,31.16 ; v1(58.704,28.994) U3.A3@58.704,29.56
  Top Layer w0.15: U9.A2@12.7,15.3 U9.B2@13.1,15.3
  Top Layer w0.2: PB1.1@0.9,51.24 v1(2.026,51.24) ; J12.A12@5.454,35.865 5.459,35.86 6.398,35.86 v1(6.403,35.854) 6.403,36.291 6.219,36.475 J12.B1@5.454,36.475 ; J12.B12@5.454,42.525 6.321,42.525 6.321,42.793 5.979,43.135 J12.A1@5.454,43.135 ; v1(6.7,39.9) 6.7,40.74 7.085,41.125 R2.2@7.1,41.125 R17.2@8.1,41.125 ; v1(8.4,46.6) v1(9.3,46.5) v1(9.8,46.3) v1(10.275,45.862) v1(10.294,45.252) v1(10.294,44.652) v1(10.294,44.052) ; 9.05,34.7 v1(9.948,34.7) ; C2.1@9.2,36.35 v1(10.243,36.35) ; v1(11.997,15.087) 12.21,15.3 U9.A2@12.7,15.3 ; C41.2@12.24,48.804 12.876,48.804 13.015,48.665 v1(13.015,48.19) U5.29@13.015,46.99 ; R37.1@13.98,12.625 13.98,12.25 14.264,11.965 14.505,11.965 v1(14.543,11.927) 14.98,11.927 ; R34.1@14.98,12.625 14.98,11.927 ; R32.1@15.98,12.625 15.98,12.171 15.736,11.927 14.98,11.927 ; R40.1@19.6,43.31 19.616,43.326 20.218,43.326 v1(20.234,43.342) ; v1(23.784,13.276) 23.812,13.276 24.109,12.979 24.621,12.979 ; C50.1@24.768,9.676 24.808,9.636 R16.1@25.758,9.636 ; C37.1@25.587,43.909 25.593,43.916 25.593,44.593 v1(25.6,44.6) ; U8.4@27.892,30.621 27.892,29.67 27.896,29.667 27.896,29.232 U8.9@29.174,27.953 ; v1(30.127,21.918) 30.131,21.922 C1.1@30.131,22.548 ; C83.1@32.665,18.935 32.682,18.952 34.146,18.952 v1(34.163,18.97) ; v1(33.73,27.599) 33.738,27.591 33.738,27.011 C34.1@33.746,27.003 ; C72.2@35.065,18.935 35.417,18.935 35.62,19.138 35.62,19.283 v1(35.639,19.302) ; v1(38.93,18.193) 38.93,18.796 39.276,19.143 C54.2@39.691,19.143 ; v1(42.269,19.744) 42.426,19.587 C52.2@42.426,19.143 ; C64.2@44.433,14.457 v1(44.433,15.464) ; C36.1@44.5,18.43 44.499,18.063 v1(44.738,17.824) ; v1(48.526,21.153) 49.761,19.918 C79.1@50.126,19.918 ; C75.1@49.126,36.734 49.616,37.224 v1(49.63,37.224) 49.64,37.224 C76.1@50.126,36.738 ; v1(50.698,16.018) v1@50.7,16.015 ; C80.1@52.426,36.723 52.426,36.734 52.916,37.224 v1(52.93,37.224) 52.94,37.224 53.426,36.738 C81.1@53.426,36.723 ; C11.1@53.574,23.16 54.083,23.16 54.322,23.399 v1(54.322,23.473) ; v1(55.1,28.833) 55.504,29.237 U3.E3@55.504,29.56 ; v1(57.073,23.16) C9.1@57.834,23.16 ; C5.1@61.248,25.253 v1(61.88,25.253) ; C7.1@61.248,26.603 v1(61.88,26.603) ; C10.1@61.248,27.953 v1(61.88,27.953) ; C8.1@61.248,29.303 v1(61.88,29.303) ; C6.1@61.248,30.653 v1(61.88,30.653)
  Top Layer w0.25: U5.19@16.83,46.1 v1(17.464,46.1) ; U5.21@16.83,47.063 v1(17.464,47.062) ; C57.1@19.812,41.134 19.831,41.115 20.421,41.115 v1(20.426,41.121) ; v1(37.426,37.468) 37.426,37.427 37.526,37.327 C33.1@37.526,36.723 ; C28.1@39.526,36.723 v1(39.526,37.468) ; C35.1@45.026,36.723 v1(45.026,37.353) ; C27.1@46.226,36.723 46.226,37.196 46.358,37.327 v1(46.358,37.368) ; C19.1@50.491,30.853 v1(51.071,30.853) ; C78.1@51.126,36.723 v1(51.761,36.723) ; U3.D7@56.303,26.36 v1(56.303,26.887) ; U3.B7@57.903,26.36 v1(57.903,26.887)
  Top Layer w0.26: v1@48.869,6.956 v1(48.875,6.95)
  Top Layer w0.28: v1(10.294,44.052) 10.326,44.052 10.528,43.85 U5.40@11,43.85 11.454,43.85 11.642,43.662 v1(11.675,43.662) 11.665,43.653 U5.1@11.665,42.96 ; v1(10.311,42.854) 10.344,42.854 10.378,42.888 U5.42@11,42.888 ; U5.35@11,46.1 11.426,46.1 v1(11.665,46.339) U5.32@11.665,46.99 ; U5.43@12.915,44.225 v1(13.78,44.225) ; U5.45@12.915,45.725 v1(13.88,45.725) ; U5.44@14.915,44.225 v1(14.915,44.99) U5.46@14.915,45.725 ; v1(16.658,42.235) 16.658,42.267 16.83,42.44 U5.12@16.83,42.888
  Top Layer w0.3: v1(2,14.6) R18.1@2.65,14.6 ; v1(6.8,48.804) C42.2@7.438,48.804 ; R10.1@9.075,33.1 10.271,33.1 10.404,32.967 10.732,32.967 v1(10.751,32.948) ; v1(9.4,48.282) C40.1@9.4,48.804 ; v1@10.339,47.073 v1(10.36,47.073) 10.37,47.062 U5.33@11,47.063 ; U5.44@14.915,44.225 15.09,44.4 v1(15.9,44.4) ; C56.1@20.048,8.534 v1(20.678,8.534) ; v1(20.478,10.173) C46.1@20.478,10.909 ; C45.1@21.878,10.909 21.878,10.403 v1(22.255,10.026) ; v1(23.078,11.262) C44.2@23.078,11.909 ; v1(23.79,7.19) C55.1@24.42,7.19 ; v1(24.187,9.676) C50.1@24.768,9.676 ; v1(27.222,28.773) 27.241,28.754 27.946,28.754 28.109,28.591 U8.9@28.109,27.953 ; 28.87,4.99 v1(29.631,4.99) ; v1(29.045,9.226) C49.1@29.045,9.962 ; U8.9@29.796,27.953 29.174,27.953 U8.9@28.109,27.953 ; v1(30.451,9.226) C48.1@30.451,9.962 ; v1(32.626,35.988) 32.626,36.547 32.802,36.723 C77.1@33.426,36.723 ; v1(33.111,23.873) 33.396,24.157 33.74,24.157 C18.1@33.746,24.163 ; v1(33.73,27.599) 33.559,27.599 33.28,27.32 28.741,27.32 U8.9@28.109,27.953 ; C74.1@34.426,36.723 34.426,37.362 34.602,37.538 v1(35.426,37.538) C73.1@35.426,36.723 ; C53.2@35.065,18 35.065,17.466 35.281,17.25 35.447,17.25 v1(35.466,17.231) ; v1@35.493,17.231 35.824,17.231 36.2,17.607 C51.2@36.2,18 ; C29.1@36.476,36.723 36.476,37.281 36.636,37.441 v1(36.636,37.468) ; C67.1@38.516,14.403 v1(38.516,15.152) ; C66.1@40.116,14.403 v1(40.116,15.152) ; C63.1@41.716,14.403 v1(41.716,15.152) ; C62.1@43.316,14.403 43.316,15.224 v1(43.56,15.469) ; U7.4@44.85,12.15 45.545,12.15 45.831,11.864 45.831,11.669 v1(45.85,11.65) ; R33.1@48.842,8.575 48.842,9 49.053,9.211 49.312,9.211 49.579,9.477 49.579,9.737 v1(49.598,9.756) 49.33,10.024 C59.2@48.842,10.024 ; v1(49.898,16.018) 49.898,15.991 50.1,15.788 C69.1@50.1,15.203 ; C32.1@50.491,29.253 50.631,29.392 50.884,29.392 51.044,29.553 v1(51.071,29.553) ; v1(50.698,16.018) 51.145,16.018 51.5,15.662 C61.1@51.5,15.203 ; v1(79.525,26.939) v1(79.525,28.939) ; v1(79.525,32.019) v1(79.525,34.019) ; v1(79.525,37.115) J5.3@79.525,38.099 v1(79.525,39.082) ; v1(85.625,26.939) J5.12@85.625,27.939 v1(85.625,28.939) ; v1(85.625,32.019) v1(85.625,34.019) ; v1(85.625,37.115) J5.4@85.625,38.099 v1(85.625,39.082)
  Top Layer w0.4: v1(9.9,20.175) 11.6,20.175 v1(11.6,21.175) ; 11.05,9.513 14.387,9.513 ; v1(22.2,36.8) 22.782,36.8 23.142,37.16 J6.2@23.142,38.099
  Top Layer w0.5: v1(6.7,13.3) 6.9,13.5 C3.1@6.9,14.6 ; v1(60.815,17.97) J8.3@62.846,17.97 ; J8.9@62.846,14.16 61.094,14.16 60.815,14.439 v1(60.815,16.7) J8.5@62.846,16.7 ; J5.22@85.325,15.239 85.725,14.839 v1(85.725,14.252)
  Int1 (GND) w0.4: 11.05,9.513 J15.1@12.4,9.513 ; 12.4,7.863 J15.1@12.4,9.513 ; 14.387,9.513 J15.1@12.4,9.513
  Int2 w0.4: J15.1@12.4,9.513 14.85,9.513
  Int3 w0.4: 11.05,9.513 J15.1@12.4,9.513 ; 12.4,7.863 J15.1@12.4,9.513 ; 14.387,9.513 J15.1@12.4,9.513
  Int4 (GND) w0.4: 11.05,9.513 J15.1@12.4,9.513 ; 12.4,7.863 J15.1@12.4,9.513 ; 14.387,9.513 J15.1@12.4,9.513
  Bottom Layer w0.2: C16.1@38.596,25.853 38.656,25.853 C17.1@39.526,26.723 C22.1@40.426,26.723 40.426,27.15 40.526,27.25 v1(40.526,27.553) 40.488,27.591 40.358,27.591 40.297,27.653 C12.1@39.826,27.653 ; C31.1@40.696,29.453 41.029,29.12 41.294,29.12 v1(41.326,29.153) ; C15.1@41.326,26.153 v1(41.326,26.753) ; C13.1@41.974,30.66 41.974,29.36 42.126,29.207 v1(42.126,29.153) 42.426,29.453 C30.1@42.926,29.453 ; v1(42.126,26.753) 42.796,26.753 C23.1@42.826,26.723 ; v1(42.926,28.353) 42.926,28.38 43.099,28.553 C25.1@43.526,28.553 43.526,28.555 43.826,28.855 C14.1@43.826,29.453 ; C26.1@42.926,31.603 43.676,32.353 v1(43.726,32.353) ; v1@42.98,27.553 43.08,27.653 C24.1@43.526,27.653 43.526,27.312 43.726,27.112 C21.1@43.726,26.723
  Bottom Layer w0.4: 11.05,9.513 J15.1@12.4,9.513 12.4,7.863
  other v1: 3.142,1.413 29.236,1.883 34.316,1.883 36.856,1.883 52.096,1.883 54.636,1.883 57.176,1.883 59.716,1.883 62.256,1.883 64.796,1.883 67.336,1.883 54.626,3.053 49.2,3.3 90.177,3.41 56.549,4.787 17,5.5 69.876,5.528 72.755,5.527 77.496,5.528 80.488,5.527 85.116,5.528 54.69,6.39 43.969,6.685 34.6,6.8 90.166,6.913 57.726,7.053 60.626,7.053 38.425,7.2 39.556,7.2 42.3,7.2 53.89,7.29 16.3,7.4 62.326,7.453 95.25,7.619 92.425,7.899 29,8 57.726,8.553 62.726,8.553 60.7,8.8 61.7,8.8 26.378,9.034 100.726,9.763 95.25,10.159 34.465,10.541 10.6,11 33.467,11.613 32.368,12.638 95.25,12.699 100.726,13.573 20.89,13.59 26,13.8 19.7,13.877 29,14.7 33.522,14.997 95.25,15.239 46.232,15.465 32.336,15.713 68.874,15.752 15.766,15.955 23.142,16.113 28,16.3 52.018,16.325 31.037,16.977 87.525,16.979 65.146,17.14 14.742,17.213 28.452,17.651 95.25,17.779 54.912,17.877 47.094,18.418 48.185,18.426 53.412,18.677 14.621,18.935 22.402,19.119 1.2,19.2 76.489,19.188 75.025,19.399 20.742,19.413 87.525,19.519 25.35,19.65 58.181,19.811 95.25,20.319 31.622,20.573 23.81,21.166 76.745,21.31 100.4,21.463 75.12,21.694 17.169,21.81 87.525,22.059 95.274,22.252 27.866,22.713 9,22.873 31.74,23.018 65.466,23.113 62.566,23.213 70.325,23.199 60.866,23.413 76.498,23.506 19.574,23.624 8.474,23.678 72.136,23.724 22.608,23.891 98.025,24.299 52.704,24.36 9,24.454 68.625,24.499 87.525,24.599 78.16,24.633 71.425,24.999 70.325,25.299 95.25,25.399 68.566,25.713 12.641,25.985 18.511,26.67 68.831,27.046 24.431,27.095 70.325,27.099 95.25,27.939 100.726,27.953 1.2,28.2 68.625,28.199 12.9,29.075 23.574,29.512 70.525,29.599 95.25,30.479 75.06,31.053 13.531,31.475 15.618,31.602 25.38,31.85 17.372,31.919 23.461,32.104 76.56,32.453 12.357,32.948 95.25,33.019 32.074,33.576 15.664,33.597 71.346,33.963 54.848,34.325 52.899,34.389 49.857,34.419 51.462,34.419 23.667,34.693 95.25,35.559 100.726,35.573 71.396,36.063 75.06,36.133 0.954,36.325 47.763,36.44 16.71,36.63 41.238,37.07 30.656,37.474 76.56,37.533 59.36,37.733 54.9,38 4.554,38.125 6.7,38.25 94.95,39.031 40.549,39.131 70.36,39.413 45.2,39.6 54.76,39.633 59.36,39.633 73,39.8 39.616,40.278 33.71,40.48 17.656,40.49 95.25,40.639 24.1,41 26.306,41.043 44.6,41.1 54.76,41.133 59.36,41.133 74.5,41.2 41.105,41.237 36.11,41.33 37.21,41.33 42.201,42.039 18,42.1 10.675,42.262 29,42.3 6.3,42.5 76.56,42.613 32.81,42.63 44.6,42.7 47.6,42.7 9.8,43 70.36,43.113 30.984,43.142 95.25,43.179 65.7,43.4 9.38,43.505 74.46,43.613 12.275,43.662 64.516,43.978 62.416,44.078 9.3,44.1 20.468,44.594 9.3,44.8 70.36,44.813 0.534,45.4 5.003,45.404 6.8,45.4 9.2,45.4 6.2,45.6 8.5,45.6 4.17,45.625 62.9,45.7 95.25,45.719 38.216,45.978 3.703,46.004 5.7,46 27.616,46.139 41.642,46.173 2.703,46.404 45.9,46.5 24.667,46.607 21.782,46.633 7.443,46.836 37.516,46.978 6.828,47.006 72.5,47 75.4,47 98.1,47 19.482,47.033 35.526,47.07 39.248,47.109 2.703,47.404 6.428,47.406 5.175,47.562 5.877,47.687 60.5,47.7 4.475,47.762 3.731,47.825 28.382,47.833 36.266,47.849 52.154,47.861 34.83,47.918 42.466,48.113 25.142,48.233 95.25,48.259 54.6,48.3 85.5,48.4 20.082,48.533 17.794,48.817 45.1,48.9 23.082,48.933 59.104,49.36 52.666,49.513 62.216,49.978 44.266,50.513 20.092,51.483 30.252,51.483 32.792,51.483 35.332,51.483 37.872,51.483 40.412,51.483 47.016,51.483 49.556,51.483 52.096,51.483 54.636,51.483 57.176,51.483 59.716,51.483 62.256,51.483 69.876,51.483 72.416,51.483 74.956,51.483 77.496,51.483 80.036,51.483 82.576,51.483 85.116,51.483 92.8,52.4
I2C4.SCL: J6.3 JDIGITAL.1 R26.1 SCL4.X U1.B5 U4.6 | length 80.2
  Top Layer w0.127: v1(16.143,31.737) 15.888,31.992 15.446,31.992 15.252,32.187 15.252,34.977 15.833,35.559 16.6,35.559 J6.3@16.674,35.559 ; v1(34.46,24.377) 35.751,24.377 U1.B5@36.126,24.753
  Top Layer w0.15: J6.3@16.6,35.559 16.178,35.98 16.178,36.055 15.874,36.359 v1(15.874,36.412) 15.874,36.442 15.495,36.821 15.495,38.695 15.824,39.024 18.347,39.024 18.792,39.468 23.015,39.468 23.566,40.019 23.566,41.268 23.863,41.565 v1(24.202,41.565) ; JDIGITAL.1@18.822,50.813 20.7,48.935 21.144,48.935 25.046,45.033 25.982,45.033 26.382,44.633 26.382,43.326 25.856,42.8 v1(25.5,42.8) 24.597,42.8 24.477,42.92 U4.6@23.671,42.92 ; v1(26.111,41.93) 26.718,41.93 27.097,41.55 27.097,41.506 27.339,41.264 27.339,38.582 27.685,38.236 27.688,38.236 27.825,38.098 R26.1@28.76,38.098
  Int3 w0.15: v1(24.202,41.565) 24.689,42.052 25.366,42.052 25.381,42.036 25.895,42.036 ; v1(25.5,42.8) 25.5,42.431 25.895,42.036 ; v1(26.111,41.93) 26.043,41.93 25.937,42.036 25.895,42.036
  Bottom Layer w0.127: v1(16.143,31.737) 16.182,31.776 16.402,31.776 16.435,31.809 16.829,31.809 17.168,31.47 19.526,31.47 19.8,31.196 19.8,29.544 19.326,29.07 18.461,29.07 17.795,28.405 17.795,22.479 18.317,21.958 22.277,21.958 24.419,24.1 29.264,24.1 29.44,23.924 29.957,23.924 30.746,24.713 32.11,24.713 32.524,24.298 34.212,24.298 34.239,24.325 34.408,24.325 v1(34.46,24.377)
  Bottom Layer w0.15: SCL4.X@13.322,35.559 14.175,36.412 v1(15.874,36.412)
I2C4.SDA: J6.4 JDIGITAL.2 R27.1 SDATA.X U1.R14 U4.5 | length 72.4
  Top Layer w0.127: J6.4@23.142,35.559 23.23,35.559 23.43,35.359 23.778,35.359 J6.4@23.822,35.315 ; v1(24.202,34.693) 24.15,34.745 24.15,34.923 24.011,35.062 24.011,35.127 J6.4@23.822,35.315 ; v1(24.645,41.23) 24.645,40.484 25.548,39.581 25.548,36.555 24.308,35.315 J6.4@23.822,35.315 ; v1(46.126,31.553) U1.R14@46.526,31.953
  Top Layer w0.15: JDIGITAL.2@21.362,50.813 21.362,49.109 25.161,45.31 26.096,45.31 26.659,44.747 26.659,43.046 25.924,42.312 ; U4.5@23.671,42.42 24.729,42.42 24.838,42.312 ; v1(24.645,41.23) 24.653,41.238 24.653,41.816 24.838,42.001 24.838,42.312 ; 25.909,42.312 24.838,42.312 ; 25.965,42.332 26.708,42.332 27.616,41.423 27.616,39.857 27.975,39.498 R27.1@28.873,39.498
  Int2 w0.127: v1(24.645,41.23) 25.188,41.23 25.445,41.488 25.445,42.176 25.844,42.574 26.535,42.574 28.84,44.88 38.322,44.88 40.519,47.076 45.039,47.076 v1(45.386,46.729)
  Int3 w0.127: v1(45.386,46.729) 45.349,46.692 45.349,46.197 45.962,45.584 45.962,37.212 46.29,36.883 46.29,35.725 46.371,35.644 46.371,34.309 45.482,33.42 45.482,32.445 46.074,31.853 46.074,31.605 v1(46.126,31.553)
  Bottom Layer w0.127: v1(24.202,34.693) 24.21,34.685 24.508,34.685 25.382,35.559 SDATA.X@26.862,35.559
JTAG.R\E\S\E\T\_1: J7.5 J8.10 JANALOG.3 JTAG_NRST.X PB1.2 R21.2 U1.K1 | length 150.7
  Top Layer w0.127: U1.K1@42.526,21.553 42.526,20.039 42.799,19.767 42.799,19.686 43.09,19.395 43.319,19.395 43.827,18.887 43.827,18.08 v1(43.807,18.06) ; 64.01,22.386 64,22.396 ; J8.10@66.746,14.16 65.326,14.16 64.746,14.74 v1(64.746,16.74) 64.746,19.854 64,20.6 64,22.396 ; v1(67.063,24.302) 65.4,24.302 64.223,23.125 64.053,23.125 v1(64,23.072) 64,22.396
  Top Layer w0.15: J8.10@66.746,14.16 R21.2@69.146,14.16
  Top Layer w0.3: v1(5.1,49.894) PB1.2@5.1,51.24
  Int2 w0.15: v1(21.7,3.3) 21.7,1.5 22.1,1.1 31.593,1.1 JANALOG.3@33.046,2.553 34.893,4.4 40.927,4.4 v1(43.225,6.699)
  Int3 w0.127: v1(43.225,6.699) 43.225,7.116 42.118,8.223 42.118,14.602 42.778,15.262 42.778,17.032 v1(43.807,18.06) ; J7.5@63.526,25.413 64.636,24.302 v1(67.063,24.302)
  Int3 w0.15: v1(5.1,49.894) 3.243,49.894 1.815,48.466 1.815,48.279 1.822,48.273 1.822,45.873 3.198,44.496 3.198,34.727 4.014,33.911 6.589,33.911 7.248,33.252 7.248,29.204 7.623,28.828 7.623,20.281 8.797,19.108 12.374,19.108 12.386,19.095 12.539,19.095 v1(12.587,19.048)
  Bottom Layer w0.127: v1(43.807,18.06) 43.852,18.106 44.06,18.106 44.438,18.484 44.989,18.484 45.474,17.999 48.362,17.999 48.892,18.53 49.978,18.53 52.899,21.45 54.687,21.45 55.59,22.353 58.569,22.353 60.028,23.812 62.539,23.812 63.278,23.072 v1(64,23.072) ; JTAG_NRST.X@64.542,17.793 64.542,16.96 64.746,16.755 v1(64.746,16.74)
  Bottom Layer w0.15: v1(12.587,19.048) 11.915,18.375 11.915,16.758 14.094,14.579 14.094,13.353 14.444,13.003 14.945,12.502 14.945,10.488 21.7,3.733 v1(21.7,3.3)
JTAG.TCK/SCK_1: J8.4 JTAG_TCK_SCK.X U1.B14 | length 84
  Top Layer w0.127: v1(32.563,34.269) 32.909,33.923 33.115,33.923 33.912,33.126 34.345,33.126 35.117,32.353 35.726,32.353 U1.B14@36.126,31.953 ; v1(68.066,25.413) 67.453,24.8 67.453,24.141 67.081,23.768 67.081,20.628 66.523,20.07 65.486,20.07 65.208,19.792 65.208,18.17 65.408,17.97 J8.4@66.746,17.97 68.129,17.97 68.474,17.625 v1(68.474,16.152)
  Int2 w0.127: v1(33.81,41.73) 34.027,41.947 34.027,42.591 34.186,42.75 39.762,42.75 41.999,44.987 61.457,44.987 61.872,44.573 64.511,44.573 v1(64.516,44.578)
  Int3 w0.127: v1(32.563,34.269) 32.16,34.672 32.16,36.27 32.57,36.681 32.57,36.829 33.092,37.351 33.092,39.041 34.101,40.049 34.101,40.642 33.81,40.933 v1(33.81,41.73) ; v1(64.516,44.578) 64.947,44.147 64.947,43.306 69.875,38.378 69.875,32.482 68.172,30.779 68.172,26.216 68.066,26.109 v1(68.066,25.413)
  Bottom Layer w0.127: JTAG_TCK_SCK.X@67.082,17.793 67.082,17.556 67.319,17.319 67.319,17.307 v1(68.474,16.152)
JTAG.TMS/SWD_1: J8.2 JTAG_TMS/SWD.X U1.C15 | length 74.5
  Top Layer w0.127: U1.C15@36.926,32.753 v1(37.326,33.153) ; v1(68.066,24.813) 67.707,24.454 67.707,24.035 67.335,23.663 67.335,20.382 66.766,19.813 66.766,19.26 J8.2@66.746,19.24 68.116,19.24 69.484,17.872 v1(69.484,15.19)
  Int2 w0.127: v1(37.243,40.757) 37.819,41.333 38.092,41.333 38.469,41.711 38.469,41.983 38.723,42.237 40.052,42.237 42.259,44.445 60.276,44.445 61.713,43.007 64.146,43.007 v1(64.516,43.378)
  Int3 w0.127: v1(37.243,40.757) 37.243,37.837 37.036,37.63 37.036,37.306 37.243,37.099 37.243,35.158 37.326,35.075 v1(37.326,33.153) ; v1(64.516,43.378) 69.575,38.318 69.575,32.606 67.918,30.949 67.918,26.449 67.653,26.184 67.653,25.225 v1(68.066,24.813)
  Bottom Layer w0.127: v1(69.484,15.19) 69.484,15.263 69.622,15.401 JTAG_TMS/SWD.X@69.622,17.793
L_7: C56.2 J15.4 R25.2 | length 25.2
  Top Layer w0.2: J15.4@3.6,12.813 J15.4@3.6,6.213 6.913,6.213 8.475,7.775 12.867,7.775 13.916,6.726 17.371,6.726 17.878,7.234 R25.2@17.878,8.834 17.896,8.816 18.351,8.816 18.633,8.534 C56.2@19.178,8.534